# Altium PCB Vibration_Datalogger.PcbDoc (part 5 of 7)
Units mm, origin at the board's own origin, x right, y up, seen from the top; angles counter-clockwise.
Board outline 75.58 x 57.4 mm, 4 copper layers (Top Layer, Int1 (GND), Int2 (PWR), Bottom Layer), stack 1.44 mm thick; 126 components, 59 nets, 413 pads, 160 vias.
Unrouted connection lines stored in the file: 53.
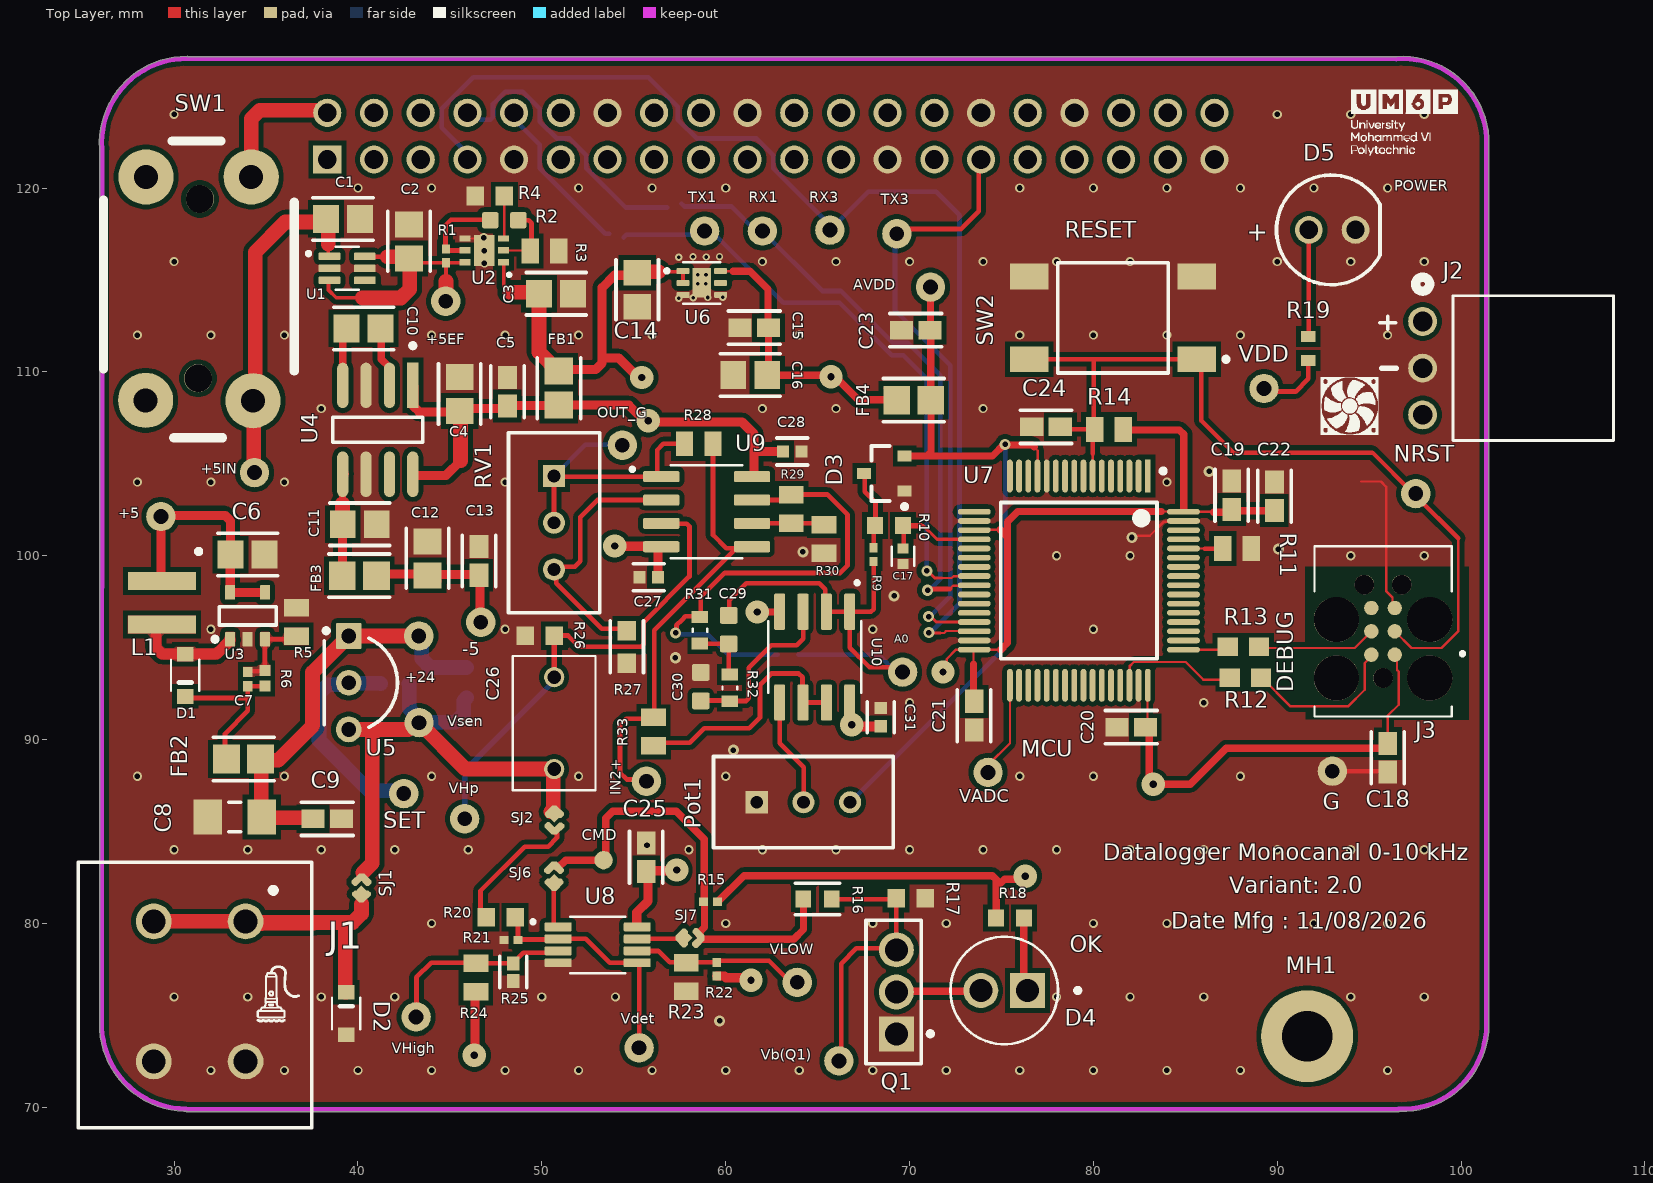
[diagram p0: Top Layer view]

## Part data (continued)
R25: "RES SMD 15K OHM 0.1% 1/16W 0402", Case Code (Imperial)=0402, Max Operating Temperature=155°C, Max Power Dissipation=63mW, Min Operating Temperature=-55°C, Power Rating=62.5mW, Resistance=15kΩ, Supplier Part Number 1=YAG2302DKR-ND, Temperature Coefficient=25ppm/°C, Tolerance=0.1%, Voltage Rating=50V, Case/Package=0402, China RoHS=Non-Compliant, ComponentLink1Description=https://datasheet.octopart.com:443/RT0402BRD0715KL-Yageo-datasheet-176402239.pdf?src-supplier=Future+Electronics, ComponentLink1URL=https://datasheet.octopart.com:443/RT0402BRD0715KL-Yageo-datasheet-176402239.pdf?src-supplier=Future+Electronics, ComponentLink2Description=https://datasheet.octopart.com:443/RT0402BRD0715KL-Yageo-datasheet-169971040.pdf?src-supplier=Future+Electronics, ComponentLink2URL=https://datasheet.octopart.com:443/RT0402BRD0715KL-Yageo-datasheet-169971040.pdf?src-supplier=Future+Electronics, ComponentLink3Description=https://datasheet.octopart.com:443/RT0402BRD0715KL-Yageo-datasheet-166250672.pdf?src-supplier=Future+Electronics, ComponentLink3URL=https://datasheet.octopart.com:443/RT0402BRD0715KL-Yageo-datasheet-166250672.pdf?src-supplier=Future+Electronics, ComponentLink4Description=https://datasheet.octopart.com:443/RT0402BRD0715KL-Yageo-datasheet-136673517.pdf?src-supplier=Future+Electronics, ComponentLink4URL=https://datasheet.octopart.com:443/RT0402BRD0715KL-Yageo-datasheet-136673517.pdf?src-supplier=Future+Electronics, ComponentLink5Description=https://datasheet.octopart.com:443/RT0402BRD0715KL-Yageo-datasheet-137700930.pdf?src-supplier=Future+Electronics, ComponentLink5URL=https://datasheet.octopart.com:443/RT0402BRD0715KL-Yageo-datasheet-137700930.pdf?src-supplier=Future+Electronics, ComponentLink6Description=https://datasheet.octopart.com:443/RT0402BRD0715KL-Yageo-datasheet-41589729.pdf?src-supplier=Future+Electronics, ComponentLink6URL=https://datasheet.octopart.com:443/RT0402BRD0715KL-Yageo-datasheet-41589729.pdf?src-supplier=Future+Electronics, ComponentLink7Description=https://datasheet.octopart.com:443/RT0402BRD0715KL-Yageo-datasheet-12594463.pdf?src-supplier=Future+Electronics, ComponentLink7URL=https://datasheet.octopart.com:443/RT0402BRD0715KL-Yageo-datasheet-12594463.pdf?src-supplier=Future+Electronics, ComponentLink8Description=https://datasheet.octopart.com:443/RT0402BRD0715KL-Yageo-datasheet-10915759.pdf?src-supplier=Future+Electronics, ComponentLink8URL=https://datasheet.octopart.com:443/RT0402BRD0715KL-Yageo-datasheet-10915759.pdf?src-supplier=Future+Electronics, ComponentLink9Description=https://datasheet.octopart.com:443/RT0402BRD0715KL-Yageo-datasheet-34924148.pdf?src-supplier=Future+Electronics, ComponentLink9URL=https://datasheet.octopart.com:443/RT0402BRD0715KL-Yageo-datasheet-34924148.pdf?src-supplier=Future+Electronics, ComponentLink10Description=https://datasheet.octopart.com:443/RT0402BRD0715KL-Yageo-datasheet-96443642.pdf?src-supplier=Upverter, ComponentLink10URL=https://datasheet.octopart.com:443/RT0402BRD0715KL-Yageo-datasheet-96443642.pdf?src-supplier=Upverter, ComponentLink11Description=https://datasheet.octopart.com:443/RT0402BRD0715KL-Yageo-Group-datasheet-188167888.pdf?src-supplier=TME, ComponentLink11URL=https://datasheet.octopart.com:443/RT0402BRD0715KL-Yageo-Group-datasheet-188167888.pdf?src-supplier=TME, ComponentLink12Description=https://datasheet.octopart.com:443/RT0402BRD0715KL-Yageo-datasheet-164439670.pdf?src-supplier=Newark, ComponentLink12URL=https://datasheet.octopart.com:443/RT0402BRD0715KL-Yageo-datasheet-164439670.pdf?src-supplier=Newark, ComponentLink13Description=https://datasheet.octopart.com:443/RT0402BRD0715KL-Yageo-Group-datasheet-141265893.pdf?src-supplier=ODG+(Origin+Data+Global), ComponentLink13URL=https://datasheet.octopart.com:443/RT0402BRD0715KL-Yageo-Group-datasheet-141265893.pdf?src-supplier=ODG+(Origin+Data+Global), ComponentLink14Description=https://datasheet.octopart.com/RT0402BRD0715KL-Yageo-datasheet-86813807.pdf, ComponentLink14URL=https://datasheet.octopart.com/RT0402BRD0715KL-Yageo-datasheet-86813807.pdf, ComponentLink15Description=http://sigma.octopart.com:80/conflict_mineral_statement/Yageo-company-3.pdf?src-supplier=Compliance+Statements, ComponentLink15URL=http://sigma.octopart.com:80/conflict_mineral_statement/Yageo-company-3.pdf?src-supplier=Compliance+Statements, ComponentLink16Description=http://sigma.octopart.com:80/rohs_statement/Yageo-company-2.pdf?src-supplier=Compliance+Statements, ComponentLink16URL=http://sigma.octopart.com:80/rohs_statement/Yageo-company-2.pdf?src-supplier=Compliance+Statements, Composition="Thin Film", Country of Origin="Mainland China", Depth=500µm, Export Control Classification Number (ECCN) Code=EAR99, Features="Moisture Resistant", Harmonized Tariff Schedule (HTS) Code=8533.21.00.30, Height=300µm, Introduction Date=2008-06-09, Lead Free="Lead Free", Length=1mm, Lifecycle Status=Production, Military Standard=Not, Mount="Surface Mount", Number of Terminals=2, Number of Terminations=2, REACH SVHC=Yes, Schedule B="8533210045, 8533210045|8533210045|8533210045|8533210045|8533210045", Supplier 1=DigiKey, Termination=SMD/SMT, Voltage Rating (DC)=50V, Width=500µm, Working Voltage=50V
R27: "RES 1K OHM 1% 1/10W 0603", Case Code (Imperial)=0603, Max Operating Temperature=155°C, Min Operating Temperature=-55°C, Power Dissipation=100mW, Resistance=1kΩ, Supplier Part Number 1=311-1.00KHRDKR-ND, Temperature Coefficient=100ppm/°C, Tolerance=1%, Voltage Rating=50V, Working Voltage=75V, Case Code (Metric)=0603, Case/Package=0603, China RoHS=Non-Compliant, ComponentLink1Description=https://datasheet.octopart.com:443/RC0603FR-071KL-Yageo-datasheet-175887523.pdf?src-supplier=Newark, ComponentLink1URL=https://datasheet.octopart.com:443/RC0603FR-071KL-Yageo-datasheet-175887523.pdf?src-supplier=Newark, ComponentLink2Description=https://datasheet.octopart.com:443/RC0603FR-071KL-Yageo-datasheet-34211833.pdf?src-supplier=Newark, ComponentLink2URL=https://datasheet.octopart.com:443/RC0603FR-071KL-Yageo-datasheet-34211833.pdf?src-supplier=Newark, ComponentLink3Description=https://datasheet.octopart.com:443/RC0603FR-071KL-Yageo-datasheet-12596169.pdf?src-supplier=Newark, ComponentLink3URL=https://datasheet.octopart.com:443/RC0603FR-071KL-Yageo-datasheet-12596169.pdf?src-supplier=Newark, ComponentLink4Description=https://datasheet.octopart.com:443/RC0603FR-071KL-Yageo-datasheet-499455.pdf?src-supplier=Newark, ComponentLink4URL=https://datasheet.octopart.com:443/RC0603FR-071KL-Yageo-datasheet-499455.pdf?src-supplier=Newark, ComponentLink5Description=https://datasheet.octopart.com:443/RC0603FR-071KL-Yageo-datasheet-503470.pdf?src-supplier=Newark, ComponentLink5URL=https://datasheet.octopart.com:443/RC0603FR-071KL-Yageo-datasheet-503470.pdf?src-supplier=Newark, ComponentLink6Description=https://datasheet.octopart.com:443/RC0603FR-071KL-Yageo-datasheet-62067350.pdf?src-supplier=element14+APAC, ComponentLink6URL=https://datasheet.octopart.com:443/RC0603FR-071KL-Yageo-datasheet-62067350.pdf?src-supplier=element14+APAC, ComponentLink7Description=https://datasheet.octopart.com:443/RC0603FR-071KL-Yageo-datasheet-21426514.pdf?src-supplier=element14+APAC, ComponentLink7URL=https://datasheet.octopart.com:443/RC0603FR-071KL-Yageo-datasheet-21426514.pdf?src-supplier=element14+APAC, ComponentLink8Description=https://datasheet.octopart.com:443/RC0603FR-071KL-Yageo-datasheet-141265859.pdf?src-supplier=Upverter, ComponentLink8URL=https://datasheet.octopart.com:443/RC0603FR-071KL-Yageo-datasheet-141265859.pdf?src-supplier=Upverter, ComponentLink9Description=https://datasheet.octopart.com:443/RC0603FR-071KL-Yageo-datasheet-103092701.pdf?src-supplier=Upverter, ComponentLink9URL=https://datasheet.octopart.com:443/RC0603FR-071KL-Yageo-datasheet-103092701.pdf?src-supplier=Upverter, ComponentLink10Description=https://sigma.octopart.com:443/138820526/technical_drawing/Yageo-RC0603FR-071KL.pdf?src-supplier=Upverter, ComponentLink10URL=https://sigma.octopart.com:443/138820526/technical_drawing/Yageo-RC0603FR-071KL.pdf?src-supplier=Upverter, ComponentLink11Description=https://datasheet.octopart.com:443/RC0603FR-071KL-Yageo-datasheet-68297981.pdf?src-supplier=Upverter, ComponentLink11URL=https://datasheet.octopart.com:443/RC0603FR-071KL-Yageo-datasheet-68297981.pdf?src-supplier=Upverter, ComponentLink12Description=https://datasheet.octopart.com:443/RC0603FR-071KL-Yageo-datasheet-8328172.pdf?src-supplier=Farnell, ComponentLink12URL=https://datasheet.octopart.com:443/RC0603FR-071KL-Yageo-datasheet-8328172.pdf?src-supplier=Farnell, ComponentLink13Description=https://datasheet.octopart.com:443/RC0603FR-071KL-Yageo-datasheet-13691069.pdf?src-supplier=Farnell, ComponentLink13URL=https://datasheet.octopart.com:443/RC0603FR-071KL-Yageo-datasheet-13691069.pdf?src-supplier=Farnell, ComponentLink14Description=https://datasheet.octopart.com:443/RC0603FR-071KL-Yageo-datasheet-15599030.pdf?src-supplier=Seeed+Studio, ComponentLink14URL=https://datasheet.octopart.com:443/RC0603FR-071KL-Yageo-datasheet-15599030.pdf?src-supplier=Seeed+Studio, ComponentLink15Description=https://datasheet.octopart.com:443/RC0603FR-071KL-Yageo-Group-datasheet-176638170.pdf?src-supplier=Future+Electronics, ComponentLink15URL=https://datasheet.octopart.com:443/RC0603FR-071KL-Yageo-Group-datasheet-176638170.pdf?src-supplier=Future+Electronics, ComponentLink16Description=https://datasheet.octopart.com:443/RC0603FR-071KL-Yageo-datasheet-164759695.pdf?src-supplier=Future+Electronics, ComponentLink16URL=https://datasheet.octopart.com:443/RC0603FR-071KL-Yageo-datasheet-164759695.pdf?src-supplier=Future+Electronics, ComponentLink17Description=https://datasheet.octopart.com:443/RC0603FR-071KL-Yageo-datasheet-137700087.pdf?src-supplier=Future+Electronics, ComponentLink17URL=https://datasheet.octopart.com:443/RC0603FR-071KL-Yageo-datasheet-137700087.pdf?src-supplier=Future+Electronics, ComponentLink18Description=https://datasheet.octopart.com:443/RC0603FR071KL-Yageo-datasheet-27584510.pdf?src-supplier=Future+Electronics, ComponentLink18URL=https://datasheet.octopart.com:443/RC0603FR071KL-Yageo-datasheet-27584510.pdf?src-supplier=Future+Electronics, ComponentLink19Description=https://datasheet.octopart.com:443/RC0603FR-071KL-Yageo-datasheet-8324193.pdf?src-supplier=Future+Electronics, ComponentLink19URL=https://datasheet.octopart.com:443/RC0603FR-071KL-Yageo-datasheet-8324193.pdf?src-supplier=Future+Electronics, ComponentLink20Description=https://datasheet.octopart.com:443/RC0603FR-071KL-Yageo-datasheet-79472498.pdf?src-supplier=Megastar, ComponentLink20URL=https://datasheet.octopart.com:443/RC0603FR-071KL-Yageo-datasheet-79472498.pdf?src-supplier=Megastar, ComponentLink21Description=https://datasheet.octopart.com/RC0603FR-071KL-Yageo-datasheet-73766026.pdf, ComponentLink21URL=https://datasheet.octopart.com/RC0603FR-071KL-Yageo-datasheet-73766026.pdf, ComponentLink22Description=https://datasheet.octopart.com:443/RC0603FR-071KL-Yageo-datasheet-118562.pdf?src-supplier=DigiKey, ComponentLink22URL=https://datasheet.octopart.com:443/RC0603FR-071KL-Yageo-datasheet-118562.pdf?src-supplier=DigiKey, ComponentLink23Description=http://sigma.octopart.com:80/conflict_mineral_statement/Yageo-company-3.pdf?src-supplier=Compliance+Statements, ComponentLink23URL=http://sigma.octopart.com:80/conflict_mineral_statement/Yageo-company-3.pdf?src-supplier=Compliance+Statements, ComponentLink24Description=http://sigma.octopart.com:80/rohs_statement/Yageo-company-2.pdf?src-supplier=Compliance+Statements, ComponentLink24URL=http://sigma.octopart.com:80/rohs_statement/Yageo-company-2.pdf?src-supplier=Compliance+Statements, Composition="Thick Film", Contact Plating=Tin, Country of Origin="Mainland China, Taiwan", Depth=800µm, Export Control Classification Number (ECCN) Code=EAR99, Harmonized Tariff Schedule (HTS) Code=8533.21.00.30, Height=450µm, Introduction Date=2004-10-04, Lead Free="Lead Free", Length=1.6mm, Lifecycle Status=Production, Military Standard=Not, Mount="Surface Mount", Number of Pins=2, Number of Terminals=2, Packaging="Tape and Reel", Power Rating=100mW, Radiation Hardening=No, REACH SVHC=Yes, Schedule B="8533210045, 8533210045|8533210045|8533210045|8533210045|8533210045|8533210045|8533210045|8533210045|8533210045|8533210045|8533210045|8533210045|8533210045|8533210045|8533210045|8533210045|8533210045|8533210045|8533210045|8533210045|8533210045|8533210045|8533210045|85", Supplier 1=DigiKey, Termination=SMD/SMT, Voltage Rating (DC)=50V, Width=800µm
R31 R32: "RES SMD 1.33KOHM 0.1% 1/10W 0603", Case Code (Imperial)=0603, Case Code (Metric)=1608, Manufacturer=Panasonic, Manufacturer Lifecycle Status=ACTIVE, Manufacturer Part Number=ERA3AEB1331V, Max Operating Temperature=155°C, Max Power Dissipation=100mW, Min Operating Temperature=-55°C, Ratings=AEC-Q200, Resistance=1.33kΩ, Supplier Part Number 1=P1.33KDBDKR-ND, Temperature Coefficient=25ppm/°C, Tolerance=0.1%, Voltage Rating=150V, Voltage Rating (DC)=75V, Case/Package=0603, Category="Chip SMD Resistors", ComponentLink1Description=https://datasheet.octopart.com:443/ERA3AEB1331V-Panasonic-datasheet-181959660.pdf?src-supplier=IHS, ComponentLink1URL=https://datasheet.octopart.com:443/ERA3AEB1331V-Panasonic-datasheet-181959660.pdf?src-supplier=IHS, ComponentLink2Description=https://datasheet.octopart.com:443/ERA3AEB1331V-Panasonic-datasheet-62287448.pdf?src-supplier=Newark, ComponentLink2URL=https://datasheet.octopart.com:443/ERA3AEB1331V-Panasonic-datasheet-62287448.pdf?src-supplier=Newark, ComponentLink3Description=https://datasheet.octopart.com:443/ERA3AEB1331V-Panasonic-datasheet-136531316.pdf?src-supplier=Newark, ComponentLink3URL=https://datasheet.octopart.com:443/ERA3AEB1331V-Panasonic-datasheet-136531316.pdf?src-supplier=Newark, ComponentLink4Description=https://datasheet.octopart.com:443/ERA-3AEB1331V-Panasonic-datasheet-154766165.pdf?src-supplier=Master+Electronics, ComponentLink4URL=https://datasheet.octopart.com:443/ERA-3AEB1331V-Panasonic-datasheet-154766165.pdf?src-supplier=Master+Electronics, ComponentLink5Description=https://datasheet.octopart.com:443/ERA3AEB1331V-Panasonic-datasheet-8367715.pdf?src-supplier=Farnell, ComponentLink5URL=https://datasheet.octopart.com:443/ERA3AEB1331V-Panasonic-datasheet-8367715.pdf?src-supplier=Farnell, ComponentLink6Description=https://datasheet.octopart.com:443/ERA3AEB1331V-Panasonic---ECG-datasheet-15994758.pdf?src-supplier=Farnell, ComponentLink6URL=https://datasheet.octopart.com:443/ERA3AEB1331V-Panasonic---ECG-datasheet-15994758.pdf?src-supplier=Farnell, ComponentLink7Description=https://datasheet.octopart.com:443/ERA3AEB1331V-Panasonic-datasheet-188913046.pdf?src-supplier=TME, ComponentLink7URL=https://datasheet.octopart.com:443/ERA3AEB1331V-Panasonic-datasheet-188913046.pdf?src-supplier=TME, ComponentLink8Description=https://sigma.octopart.com:443/150570796/technical_drawing/Panasonic-ERA3AEB1331V.pdf?src-supplier=Panasonic+SCT, ComponentLink8URL=https://sigma.octopart.com:443/150570796/technical_drawing/Panasonic-ERA3AEB1331V.pdf?src-supplier=Panasonic+SCT, ComponentLink9Description=https://datasheet.octopart.com:443/ERA3AEB1331V-Panasonic-datasheet-138783076.pdf?src-supplier=Burklin+Elektronik, ComponentLink9URL=https://datasheet.octopart.com:443/ERA3AEB1331V-Panasonic-datasheet-138783076.pdf?src-supplier=Burklin+Elektronik, ComponentLink10Description=https://datasheet.octopart.com/ERA3AEB1331V-Panasonic-datasheet-78375410.pdf, ComponentLink10URL=https://datasheet.octopart.com/ERA3AEB1331V-Panasonic-datasheet-78375410.pdf, ComponentLink11Description=https://datasheet.octopart.com:443/ERA-3AEB1331V-Panasonic-datasheet-62096640.pdf?src-supplier=Future+Electronics, ComponentLink11URL=https://datasheet.octopart.com:443/ERA-3AEB1331V-Panasonic-datasheet-62096640.pdf?src-supplier=Future+Electronics, ComponentLink12Description=https://datasheet.octopart.com:443/ERA3AEB1331V-Panasonic-datasheet-13266200.pdf?src-supplier=Electro+Sonic, ComponentLink12URL=https://datasheet.octopart.com:443/ERA3AEB1331V-Panasonic-datasheet-13266200.pdf?src-supplier=Electro+Sonic, ComponentLink13Description=https://datasheet.octopart.com:443/ERA3AEB1331V-Panasonic-datasheet-33006989.pdf?src-supplier=Electro+Sonic, ComponentLink13URL=https://datasheet.octopart.com:443/ERA3AEB1331V-Panasonic-datasheet-33006989.pdf?src-supplier=Electro+Sonic, ComponentLink14Description=https://datasheet.octopart.com:443/ERA-3AEB1331V-Panasonic-datasheet-46744048.pdf?src-supplier=Electro+Sonic, ComponentLink14URL=https://datasheet.octopart.com:443/ERA-3AEB1331V-Panasonic-datasheet-46744048.pdf?src-supplier=Electro+Sonic, Composition="Thin Film", Contact Plating=Tin, Depth=800µm, Features="Automotive AEC-Q200", Height=450µm, Height - Seated (Max)=558.8µm, Lead Free="Lead Free", Length=1.6mm, Lifecycle Status=Production, Military Standard=Not, Mount="Surface Mount", Number of Pins=2, Number of Terminals=2, Number of Terminations=2, Packaging="Tape & Reel", Part Series="Thin Film Chip Resistors, High Reliability Type", Power Rating=100mW, Radiation Hardening=No, REACH SVHC=Yes, Schedule B="8533210045, 8533210045|8533210045, 8533210045|8533210045|8533210045, 8533210045|8533210045|8533210045|8533210045", Supplier 1=DigiKey, Termination=SMD/SMT, Width=800µm, Working Voltage=75V
SW1: "Boutons-poussoirs 1 Pole Vertical 1A 14.5V 1.5mm Travel", Contact Resistance=100mΩ, Current Rating=1A, Insulation Resistance=3MΩ, Manufacturer=ALPS, Max Operating Temperature=85°C, Max Voltage Rating (DC)=14.5V, Min Operating Temperature=-40°C, Operating Force=3N, Supplier Part Number 1=688-SPEF110100, Voltage Rating (AC)=100V, Actuator Length=5.0038mm, Category="Pushbutton Switches", ComponentLink1Description=https://datasheet.octopart.com:443/SPEF110100-ALPS-datasheet-182234832.pdf?src-supplier=IHS, ComponentLink1URL=https://datasheet.octopart.com:443/SPEF110100-ALPS-datasheet-182234832.pdf?src-supplier=IHS, ComponentLink2Description=https://datasheet.octopart.com:443/SPEF110100-ALPS-datasheet-182235328.pdf?src-supplier=IHS, ComponentLink2URL=https://datasheet.octopart.com:443/SPEF110100-ALPS-datasheet-182235328.pdf?src-supplier=IHS, Electrical Life=30kcycles, Export Control Classification Number (ECCN) Code=EAR99, Harmonized Tariff Schedule (HTS) Code=8536.50.70.00, Height=6.9mm, Introduction Date=2015-04-16, Length=9.398mm, Lifecycle Status=Production, Manufacturer Part Number=SPEF110100, Max Current Rating=1A, Mount=Bushing, Radiation Hardening=No, Supplier 1=Mouser, Termination=Solder, Throw Configuration=SPDT, Voltage Rating (DC)=14.5V
SW2: "SWITCH TACTILE SPST-NO 0.05A 12V", Color=Beige, Contact Resistance=100mΩ, Current Rating=50mA, Insulation Resistance=100MΩ, Max Operating Temperature=70°C, Max Voltage Rating (DC)=12V, Min Operating Temperature=-40°C, Operating Force=2.55N, Supplier Part Number 1=EG2527CT-ND, Actuator Length=1.4mm, Actuator Material="Nylon, Polyamide", China RoHS=Compliant, ComponentLink1Description=https://datasheet.octopart.com:443/TL3301AF260QG-E-Switch-datasheet-165859977.pdf?src-supplier=Future+Electronics, ComponentLink1URL=https://datasheet.octopart.com:443/TL3301AF260QG-E-Switch-datasheet-165859977.pdf?src-supplier=Future+Electronics, ComponentLink2Description=https://datasheet.octopart.com:443/TL3301AF260QG-E-Switch-datasheet-32479546.pdf?src-supplier=Future+Electronics, ComponentLink2URL=https://datasheet.octopart.com:443/TL3301AF260QG-E-Switch-datasheet-32479546.pdf?src-supplier=Future+Electronics, ComponentLink3Description=https://datasheet.octopart.com:443/TL3301AF260QG-E-Switch-datasheet-26831008.pdf?src-supplier=Future+Electronics, ComponentLink3URL=https://datasheet.octopart.com:443/TL3301AF260QG-E-Switch-datasheet-26831008.pdf?src-supplier=Future+Electronics, ComponentLink4Description=https://datasheet.octopart.com:443/TL3301AF260QG-E-Switch-datasheet-8331992.pdf?src-supplier=Future+Electronics, ComponentLink4URL=https://datasheet.octopart.com:443/TL3301AF260QG-E-Switch-datasheet-8331992.pdf?src-supplier=Future+Electronics, ComponentLink5Description=https://datasheet.octopart.com:443/TL3301AF260QG-E-Switch-datasheet-500121.pdf?src-supplier=Farnell, ComponentLink5URL=https://datasheet.octopart.com:443/TL3301AF260QG-E-Switch-datasheet-500121.pdf?src-supplier=Farnell, ComponentLink6Description=https://datasheet.octopart.com:443/TL3301AF260QG-E-Switch-datasheet-100437263.pdf?src-supplier=Farnell, ComponentLink6URL=https://datasheet.octopart.com:443/TL3301AF260QG-E-Switch-datasheet-100437263.pdf?src-supplier=Farnell, ComponentLink7Description=https://datasheet.octopart.com:443/TL3301AF260QG-E-Switch-datasheet-140258799.pdf?src-supplier=LKR, ComponentLink7URL=https://datasheet.octopart.com:443/TL3301AF260QG-E-Switch-datasheet-140258799.pdf?src-supplier=LKR, ComponentLink8Description=https://datasheet.octopart.com:443/TL3301AF260QG-E-Switch-datasheet-27847350.pdf?src-supplier=Master+Electronics, ComponentLink8URL=https://datasheet.octopart.com:443/TL3301AF260QG-E-Switch-datasheet-27847350.pdf?src-supplier=Master+Electronics, ComponentLink9Description=https://datasheet.octopart.com:443/TL3301AF260QG-E-Switch-datasheet-155463340.pdf?src-supplier=TME, ComponentLink9URL=https://datasheet.octopart.com:443/TL3301AF260QG-E-Switch-datasheet-155463340.pdf?src-supplier=TME, Contact Material=Silver, Contact Plating=Silver, Electrical Life=100kcycles, Export Control Classification Number (ECCN) Code=EAR99, Harmonized Tariff Schedule (HTS) Code=8536.50.90.40, Height=3.6mm, Housing Material=Nylon, Illumination Type="Illuminated, Non-Illuminated", Introduction Date=2002-10-30, Lead Free="Lead Free", Length=6mm, Lifecycle Status=Production, Max Current Rating=50mA, Mechanical Life=100kcycles, Mount="Surface Mount", Number of Positions=1, Orientation=Straight, REACH SVHC=Yes, Supplier 1=DigiKey, Switch Function=Off-Mom, Switch Travel=250µm, Termination="Gull Wing", Throw Configuration=SPST, Voltage Rating (DC)=12V
U1: "IC OR CTRLR IDEAL DIODE SC70-6", Manufacturer="Analog Devices", Manufacturer Lifecycle Status=PRODUCTION, Manufacturer Part Number=MAX40200EVKIT#, Supplier Part Number 1=MAX40200EVKIT#-ND, Category="Amplifiers - Op Amps, Buffer, Instrumentation", ComponentLink1Description=https://octopart.com:443/opatz8j6/c1?t=tFvwJybQxdRSwHGuV29_04fkZjjNF1MJo4kinNSI_C2zYoGudT1WcQQrGEb18paZwrfXNr0GAhVW6zbilzcBUB01kDOundBfp3nAPKdGzhNRfNcr8Kd-o-IKbnLChbPI5acuj80HihnZ3YpglhuC93YoD2liOY8pIrKlWfxI2ksNeIXQmkzMRd3OxJBCHjiq5JwTIkqXKKJBcnIlnmQq-BxXXM0xZlJtTE9yy0iN-9Jw-BxLeaepZGVZeQukyGP-V4ddPgPOIL7y7GG0xbs0JlcCHvXn2V6R1aO10raT6v7tAmg4PF3dHGB7KA&src-supplier=Analog+Devices, ComponentLink1URL=https://octopart.com:443/opatz8j6/c1?t=tFvwJybQxdRSwHGuV29_04fkZjjNF1MJo4kinNSI_C2zYoGudT1WcQQrGEb18paZwrfXNr0GAhVW6zbilzcBUB01kDOundBfp3nAPKdGzhNRfNcr8Kd-o-IKbnLChbPI5acuj80HihnZ3YpglhuC93YoD2liOY8pIrKlWfxI2ksNeIXQmkzMRd3OxJBCHjiq5JwTIkqXKKJBcnIlnmQq-BxXXM0xZlJtTE9yy0iN-9Jw-BxLeaepZGVZeQukyGP-V4ddPgPOIL7y7GG0xbs0JlcCHvXn2V6R1aO10raT6v7tAmg4PF3dHGB7KA&src-supplier=Analog+Devices, ComponentLink2Description=https://datasheet.octopart.com:443/MAX40200EVKIT%23-Analog-Devices-datasheet-68620197.pdf?src-supplier=Newark, ComponentLink2URL=https://datasheet.octopart.com:443/MAX40200EVKIT%23-Analog-Devices-datasheet-68620197.pdf?src-supplier=Newark, ComponentLink3Description=https://datasheet.octopart.com:443/MAX40200EVKIT%23-Maxim-Integrated-datasheet-97040573.pdf?src-supplier=Ciiva, ComponentLink3URL=https://datasheet.octopart.com:443/MAX40200EVKIT%23-Maxim-Integrated-datasheet-97040573.pdf?src-supplier=Ciiva, ComponentLink4Description=http://sigma.octopart.com:80/conflict_mineral_statement/Analog-Devices-company-33.pdf?src-supplier=Compliance+Statements, ComponentLink4URL=http://sigma.octopart.com:80/conflict_mineral_statement/Analog-Devices-company-33.pdf?src-supplier=Compliance+Statements, ComponentLink5Description=http://sigma.octopart.com:80/reach_statement/Maxim-Integrated-company-67.pdf?src-supplier=Compliance+Statements, ComponentLink5URL=http://sigma.octopart.com:80/reach_statement/Maxim-Integrated-company-67.pdf?src-supplier=Compliance+Statements, ComponentLink6Description=http://sigma.octopart.com:80/rohs_statement/Maxim-Integrated-company-66.pdf?src-supplier=Compliance+Statements, ComponentLink6URL=http://sigma.octopart.com:80/rohs_statement/Maxim-Integrated-company-66.pdf?src-supplier=Compliance+Statements, ComponentLink7Description=http://sigma.octopart.com:80/conflict_mineral_statement/Maxim-Integrated-company-65.pdf?src-supplier=Compliance+Statements, ComponentLink7URL=http://sigma.octopart.com:80/conflict_mineral_statement/Maxim-Integrated-company-65.pdf?src-supplier=Compliance+Statements, ComponentLink8Description=https://octopart.com:443/opatz8j6/c1?t=lhYu1Dpa7LTUDRbSap38YS8RgdPNFucjyNBj1iBkH97VRV8Rz1sSJR_WbuGUEwASAToy64Q0WSWPLIrJ0T-nAuuegVbGWQDHKGX6zqZYr7BGDpqmoHu2Bx2I_9gTjHXC6Q3FVvsiWqfKxC4DKphXuDHYAktRAVkNYmR-AyWh8y_m0Ao45k5rUSJWIEdRU4kKjG7oew-8Zey8BXwpe1A7gxB-7jWBlaKfgfRJWbIXmBBGq6MNPZxkt7axoHwTDuLmHCNj-BNWr3LFNcmmigWLHCOy2qpNNTU7f_1GGqCMT2krBxkwy2j1AE6zAA&src-supplier=Compliance+Statements, ComponentLink8URL=https://octopart.com:443/opatz8j6/c1?t=lhYu1Dpa7LTUDRbSap38YS8RgdPNFucjyNBj1iBkH97VRV8Rz1sSJR_WbuGUEwASAToy64Q0WSWPLIrJ0T-nAuuegVbGWQDHKGX6zqZYr7BGDpqmoHu2Bx2I_9gTjHXC6Q3FVvsiWqfKxC4DKphXuDHYAktRAVkNYmR-AyWh8y_m0Ao45k5rUSJWIEdRU4kKjG7oew-8Zey8BXwpe1A7gxB-7jWBlaKfgfRJWbIXmBBGq6MNPZxkt7axoHwTDuLmHCNj-BNWr3LFNcmmigWLHCOy2qpNNTU7f_1GGqCMT2krBxkwy2j1AE6zAA&src-supplier=Compliance+Statements, ComponentLink9Description=https://sigma.octopart.com:443/182282881/technical_drawing/Texas-Instruments-LM66100DCKR.pdf?src-supplier=Texas+Instruments, ComponentLink9URL=https://sigma.octopart.com:443/182282881/technical_drawing/Texas-Instruments-LM66100DCKR.pdf?src-supplier=Texas+Instruments, ComponentLink10Description=https://octopart.com:443/opatz8j6/c1?t=gPN0KfNaSyl1Jmpah-FtwEVBma6UUM1rl0h9fkGMVmOMkDkGAR5eANZSmXeULewPONOsdPcJF3l7HmsVxdSPKkJhfxN-W-y3_Dz8nEmVy4_KCMSg8IKJ1aK1b6dd_-lBB8AspW_E3SjYcpWMYk21piWnDxo2wj_olAEqlfdPT3wM4A0W15MhlRfy1F4koMZBOZ1iTSy3Fn5Q08Ie82jiMGpjle9KvlKTYKALn1cbScAkVWpjv40trNU2vz6I3zWF1hu3m4xMYxVIRa3xiN9pV6fBa2Lpcw1bs8mCpy-ETl7Wi3TV7TgH1BZJhC7NO3ryfYbwwTmsEcijnrG4LoteN3ANdJgPfKX2jeXCkaz5iFtb7oDgnzFTK08_BwgTfkX6eAf0F7jE&src-supplier=Texas+Instruments, ComponentLink10URL=https://octopart.com:443/opatz8j6/c1?t=gPN0KfNaSyl1Jmpah-FtwEVBma6UUM1rl0h9fkGMVmOMkDkGAR5eANZSmXeULewPONOsdPcJF3l7HmsVxdSPKkJhfxN-W-y3_Dz8nEmVy4_KCMSg8IKJ1aK1b6dd_-lBB8AspW_E3SjYcpWMYk21piWnDxo2wj_olAEqlfdPT3wM4A0W15MhlRfy1F4koMZBOZ1iTSy3Fn5Q08Ie82jiMGpjle9KvlKTYKALn1cbScAkVWpjv40trNU2vz6I3zWF1hu3m4xMYxVIRa3xiN9pV6fBa2Lpcw1bs8mCpy-ETl7Wi3TV7TgH1BZJhC7NO3ryfYbwwTmsEcijnrG4LoteN3ANdJgPfKX2jeXCkaz5iFtb7oDgnzFTK08_BwgTfkX6eAf0F7jE&src-supplier=Texas+Instruments, ComponentLink11Description=https://sigma.octopart.com:443/178868976/technical_drawing/Texas-Instruments-LM66100DCKR.pdf?src-supplier=Texas+Instruments, ComponentLink11URL=https://sigma.octopart.com:443/178868976/technical_drawing/Texas-Instruments-LM66100DCKR.pdf?src-supplier=Texas+Instruments, ComponentLink12Description=https://sigma.octopart.com:443/49249328/technical_drawing/Texas-Instruments-LM66100DCKR.pdf?src-supplier=Texas+Instruments, ComponentLink12URL=https://sigma.octopart.com:443/49249328/technical_drawing/Texas-Instruments-LM66100DCKR.pdf?src-supplier=Texas+Instruments, ComponentLink13Description=https://datasheet.octopart.com:443/LM66100DCKR-Texas-Instruments-datasheet-159115275.pdf?src-supplier=SHENGYU+ELECTRONICS, ComponentLink13URL=https://datasheet.octopart.com:443/LM66100DCKR-Texas-Instruments-datasheet-159115275.pdf?src-supplier=SHENGYU+ELECTRONICS, ComponentLink14Description=https://datasheet.octopart.com:443/LM66100DCKR-Texas-Instruments-datasheet-159115156.pdf?src-supplier=LCSC, ComponentLink14URL=https://datasheet.octopart.com:443/LM66100DCKR-Texas-Instruments-datasheet-159115156.pdf?src-supplier=LCSC, ComponentLink15Description=http://sigma.octopart.com:80/reach_statement/Texas-Instruments-company-64.pdf?src-supplier=Compliance+Statements, ComponentLink15URL=http://sigma.octopart.com:80/reach_statement/Texas-Instruments-company-64.pdf?src-supplier=Compliance+Statements, ComponentLink16Description=http://sigma.octopart.com:80/conflict_mineral_statement/Texas-Instruments-company-63.pdf?src-supplier=Compliance+Statements, ComponentLink16URL=http://sigma.octopart.com:80/conflict_mineral_statement/Texas-Instruments-company-63.pdf?src-supplier=Compliance+Statements, Height=1.1mm, Length=2mm, Lifecycle Status=Production, Number of Pins=0, Schedule B="8542390000, 8542390000|8542390000|8542390000|8542390000|8542390000", Supplier 1=DigiKey, Supplier 2=DigiKey, Supplier Part Number 2=296-53541-1-ND, Thickness=900µm, Width=1.25mm
U2: "2.7-V TO 19-V 100-M EFUSE WITH O", Manufacturer="Texas Instruments", Manufacturer Lifecycle Status=ACTIVE, Supplier Part Number 1=296-TPS25961DRVRCT-ND, Category="Hot Swap Controllers", ComponentLink1Description=https://octopart.com:443/opatz8j6/c1?t=S1xkJqIgFHoRAs614Sh_f7mDPqY7n-9g1CVa4cNi5hxx6g81t8padSBjg378zsPx6m8IwrYaHi_RuHHS21coeVQCG3OxsLdcu6lzfAPU48-dyrvk4_ASk2QRBurpyuabN2jgAu76qrWKpaNbvEDSpOfD9CHua-RjlsRQwE5NGihYh6lU7KWDTs2xfTKoO0KOZB2pCRcjwk9NKxuG5vtAjT0Cx9vbluxsxBt5EiWrL8zHsz4VK5ehUOpKD3pUvdaCDW2TUYzUcGjzIwsfOe_OcwxBHByljdTQNEQqxSW97k3uNZ3rjtL21G73W6U59wTNDYHWdyWMBiSPwAoe43ZHRhsDoItLFKopzT7Ap-yvRHOtwgVqoKwa7xdY_lMZ9kctMjWSG-4I&src-supplier=Texas+Instruments, ComponentLink1URL=https://octopart.com:443/opatz8j6/c1?t=S1xkJqIgFHoRAs614Sh_f7mDPqY7n-9g1CVa4cNi5hxx6g81t8padSBjg378zsPx6m8IwrYaHi_RuHHS21coeVQCG3OxsLdcu6lzfAPU48-dyrvk4_ASk2QRBurpyuabN2jgAu76qrWKpaNbvEDSpOfD9CHua-RjlsRQwE5NGihYh6lU7KWDTs2xfTKoO0KOZB2pCRcjwk9NKxuG5vtAjT0Cx9vbluxsxBt5EiWrL8zHsz4VK5ehUOpKD3pUvdaCDW2TUYzUcGjzIwsfOe_OcwxBHByljdTQNEQqxSW97k3uNZ3rjtL21G73W6U59wTNDYHWdyWMBiSPwAoe43ZHRhsDoItLFKopzT7Ap-yvRHOtwgVqoKwa7xdY_lMZ9kctMjWSG-4I&src-supplier=Texas+Instruments, ComponentLink2Description=http://sigma.octopart.com:80/reach_statement/Texas-Instruments-company-64.pdf?src-supplier=Compliance+Statements, ComponentLink2URL=http://sigma.octopart.com:80/reach_statement/Texas-Instruments-company-64.pdf?src-supplier=Compliance+Statements, ComponentLink3Description=http://sigma.octopart.com:80/conflict_mineral_statement/Texas-Instruments-company-63.pdf?src-supplier=Compliance+Statements, ComponentLink3URL=http://sigma.octopart.com:80/conflict_mineral_statement/Texas-Instruments-company-63.pdf?src-supplier=Compliance+Statements, Height=800µm, Length=2mm, Lifecycle Status=Production, Manufacturer Part Number=TPS25961DRVR, Number of Pins=6, Supplier 1=DigiKey, Thickness=750µm, Width=2mm
U3: "IC LED DRVR RGLTR PWM SOT23-5", Case/Package=SOT-23, Frequency=1MHz, High Level Output Current=50mA, Manufacturer Lifecycle Status=ACTIVE, Max Input Voltage=6V, Max Operating Temperature=85°C, Max Output Voltage=28V, Max Supply Current=50µA, Min Input Voltage=1.8V, Min Operating Temperature=-40°C, Output Current=250mA, Output Power=357mW, Quiescent Current=28µA, Supplier Part Number 1=296-12686-6-ND, ComponentLink1Description=https://sigma.octopart.com:443/177332311/technical_drawing/Texas-Instruments-TPS61041DBVR.pdf?src-supplier=Texas+Instruments, ComponentLink1URL=https://sigma.octopart.com:443/177332311/technical_drawing/Texas-Instruments-TPS61041DBVR.pdf?src-supplier=Texas+Instruments, ComponentLink2Description=https://octopart.com:443/opatz8j6/c1?t=k3wc_2YAHre9aEKvrtUL4WiH_7gyz5vvYIpgl3-_DoieH9_J--UOA_4swiipad8nwfdCqRPE7cAU4y7fXoWH5s6gY_OEZpDmt4BRm_vJuqCU6_G0QTbABtNIj9X3Wk4rNKXV0JPXgFqA4mKESAibKFXCpnwvyJyx-23z5q8y4uzBqg0JgwBOXenSBHlC9K7HJNs8eSKIWkGQ0JIBH81RxiwzCGA96NNC9jBkZo0lS8D4_ep_iqgTZ6YmA3U9-nDW1JxenI6HkSB-BibaSeiW2gkfclnyBbKiNZExXKpJZUM-3bb4z0zpDkNUz1E0CZwEhr9E5_3q7KKvBqOAVMCAxqghPF0D-78aDMoSTVOHvFhBGbArx7jxUefcD653syxCxtR4QA&src-supplier=Texas+Instruments, ComponentLink2URL=https://octopart.com:443/opatz8j6/c1?t=k3wc_2YAHre9aEKvrtUL4WiH_7gyz5vvYIpgl3-_DoieH9_J--UOA_4swiipad8nwfdCqRPE7cAU4y7fXoWH5s6gY_OEZpDmt4BRm_vJuqCU6_G0QTbABtNIj9X3Wk4rNKXV0JPXgFqA4mKESAibKFXCpnwvyJyx-23z5q8y4uzBqg0JgwBOXenSBHlC9K7HJNs8eSKIWkGQ0JIBH81RxiwzCGA96NNC9jBkZo0lS8D4_ep_iqgTZ6YmA3U9-nDW1JxenI6HkSB-BibaSeiW2gkfclnyBbKiNZExXKpJZUM-3bb4z0zpDkNUz1E0CZwEhr9E5_3q7KKvBqOAVMCAxqghPF0D-78aDMoSTVOHvFhBGbArx7jxUefcD653syxCxtR4QA&src-supplier=Texas+Instruments, ComponentLink3Description=https://datasheet.octopart.com:443/TPS61041DBVR-Texas-Instruments-datasheet-37140377.pdf?src-supplier=Texas+Instruments, ComponentLink3URL=https://datasheet.octopart.com:443/TPS61041DBVR-Texas-Instruments-datasheet-37140377.pdf?src-supplier=Texas+Instruments, ComponentLink4Description=https://sigma.octopart.com:443/175570406/technical_drawing/Texas-Instruments-TPS61041DBVR.pdf?src-supplier=Texas+Instruments, ComponentLink4URL=https://sigma.octopart.com:443/175570406/technical_drawing/Texas-Instruments-TPS61041DBVR.pdf?src-supplier=Texas+Instruments, ComponentLink5Description=https://sigma.octopart.com:443/169406034/technical_drawing/Texas-Instruments-TPS61041DBVR.pdf?src-supplier=Texas+Instruments, ComponentLink5URL=https://sigma.octopart.com:443/169406034/technical_drawing/Texas-Instruments-TPS61041DBVR.pdf?src-supplier=Texas+Instruments, ComponentLink6Description=https://sigma.octopart.com:443/155939316/technical_drawing/Texas-Instruments-TPS61041DBVR.pdf?src-supplier=Texas+Instruments, ComponentLink6URL=https://sigma.octopart.com:443/155939316/technical_drawing/Texas-Instruments-TPS61041DBVR.pdf?src-supplier=Texas+Instruments, ComponentLink7Description=https://sigma.octopart.com:443/102331370/technical_drawing/Texas-Instruments-TPS61041DBVR.pdf?src-supplier=Texas+Instruments, ComponentLink7URL=https://sigma.octopart.com:443/102331370/technical_drawing/Texas-Instruments-TPS61041DBVR.pdf?src-supplier=Texas+Instruments, ComponentLink8Description=https://datasheet.octopart.com:443/TPS61041DBVR-Texas-Instruments-datasheet-34157400.pdf?src-supplier=Texas+Instruments, ComponentLink8URL=https://datasheet.octopart.com:443/TPS61041DBVR-Texas-Instruments-datasheet-34157400.pdf?src-supplier=Texas+Instruments, ComponentLink9Description=https://sigma.octopart.com:443/49249325/technical_drawing/Texas-Instruments-TPS61041DBVR.pdf?src-supplier=Texas+Instruments, ComponentLink9URL=https://sigma.octopart.com:443/49249325/technical_drawing/Texas-Instruments-TPS61041DBVR.pdf?src-supplier=Texas+Instruments, ComponentLink10Description=https://datasheet.octopart.com:443/TPS61041DBVR-Texas-Instruments-datasheet-10256988.pdf?src-supplier=Texas+Instruments, ComponentLink10URL=https://datasheet.octopart.com:443/TPS61041DBVR-Texas-Instruments-datasheet-10256988.pdf?src-supplier=Texas+Instruments, ComponentLink11Description=https://datasheet.octopart.com:443/TPS61041DBVR-Texas-Instruments-datasheet-150964.pdf?src-supplier=Farnell, ComponentLink11URL=https://datasheet.octopart.com:443/TPS61041DBVR-Texas-Instruments-datasheet-150964.pdf?src-supplier=Farnell, ComponentLink12Description=https://datasheet.octopart.com:443/TPS61041DBVR-Texas-Instruments-datasheet-13549163.pdf?src-supplier=Upverter, ComponentLink12URL=https://datasheet.octopart.com:443/TPS61041DBVR-Texas-Instruments-datasheet-13549163.pdf?src-supplier=Upverter, ComponentLink13Description=https://datasheet.octopart.com:443/TPS61041DBVR-Texas-Instruments-datasheet-66617810.pdf?src-supplier=Newark, ComponentLink13URL=https://datasheet.octopart.com:443/TPS61041DBVR-Texas-Instruments-datasheet-66617810.pdf?src-supplier=Newark, ComponentLink14Description=https://datasheet.octopart.com:443/TPS61041DBVR-Texas-Instruments-datasheet-5394864.pdf?src-supplier=Newark, ComponentLink14URL=https://datasheet.octopart.com:443/TPS61041DBVR-Texas-Instruments-datasheet-5394864.pdf?src-supplier=Newark, ComponentLink15Description=https://datasheet.octopart.com:443/TPS61041DBVR-Texas-Instruments-datasheet-33019193.pdf?src-supplier=Newark, ComponentLink15URL=https://datasheet.octopart.com:443/TPS61041DBVR-Texas-Instruments-datasheet-33019193.pdf?src-supplier=Newark, ComponentLink16Description=https://datasheet.octopart.com:443/TPS61041DBVR-Texas-Instruments-datasheet-28738.pdf?src-supplier=Newark, ComponentLink16URL=https://datasheet.octopart.com:443/TPS61041DBVR-Texas-Instruments-datasheet-28738.pdf?src-supplier=Newark, ComponentLink17Description=https://datasheet.octopart.com:443/TPS61041DBVR-Texas-Instruments-datasheet-165804802.pdf?src-supplier=LCSC, ComponentLink17URL=https://datasheet.octopart.com:443/TPS61041DBVR-Texas-Instruments-datasheet-165804802.pdf?src-supplier=LCSC, ComponentLink18Description=https://datasheet.octopart.com:443/TPS61041DBVR-Texas-Instruments-datasheet-159118170.pdf?src-supplier=LCSC, ComponentLink18URL=https://datasheet.octopart.com:443/TPS61041DBVR-Texas-Instruments-datasheet-159118170.pdf?src-supplier=LCSC, ComponentLink19Description=https://datasheet.octopart.com:443/TPS61041DBVR-Texas-Instruments-datasheet-137316104.pdf?src-supplier=Future+Electronics, ComponentLink19URL=https://datasheet.octopart.com:443/TPS61041DBVR-Texas-Instruments-datasheet-137316104.pdf?src-supplier=Future+Electronics, ComponentLink20Description=https://datasheet.octopart.com:443/TPS61041DBVR-Texas-Instruments-datasheet-17023098.pdf?src-supplier=Factory+Futures, ComponentLink20URL=https://datasheet.octopart.com:443/TPS61041DBVR-Texas-Instruments-datasheet-17023098.pdf?src-supplier=Factory+Futures, ComponentLink21Description=https://datasheet.octopart.com:443/TPS61041DBVR-Texas-Instruments-datasheet-14155781.pdf?src-supplier=iiiC, ComponentLink21URL=https://datasheet.octopart.com:443/TPS61041DBVR-Texas-Instruments-datasheet-14155781.pdf?src-supplier=iiiC, ComponentLink22Description=https://datasheet.octopart.com:443/TPS61041DBVR-Texas-Instruments-datasheet-8716823.pdf?src-supplier=element14, ComponentLink22URL=https://datasheet.octopart.com:443/TPS61041DBVR-Texas-Instruments-datasheet-8716823.pdf?src-supplier=element14, ComponentLink23Description=https://datasheet.octopart.com:443/TPS61041DBVR-Texas-Instruments-datasheet-8444271.pdf?src-supplier=Jameco, ComponentLink23URL=https://datasheet.octopart.com:443/TPS61041DBVR-Texas-Instruments-datasheet-8444271.pdf?src-supplier=Jameco, ComponentLink24Description=https://datasheet.octopart.com:443/TPS61041DBVR-Texas-Instruments-datasheet-112971.pdf?src-supplier=Sierra+IC, ComponentLink24URL=https://datasheet.octopart.com:443/TPS61041DBVR-Texas-Instruments-datasheet-112971.pdf?src-supplier=Sierra+IC, ComponentLink25Description=https://datasheet.octopart.com:443/TPS61041DBVR-Texas-Instruments-datasheet-46314.pdf?src-supplier=DigiKey, ComponentLink25URL=https://datasheet.octopart.com:443/TPS61041DBVR-Texas-Instruments-datasheet-46314.pdf?src-supplier=DigiKey, ComponentLink26Description=http://sigma.octopart.com:80/reach_statement/Texas-Instruments-company-64.pdf?src-supplier=Compliance+Statements, ComponentLink26URL=http://sigma.octopart.com:80/reach_statement/Texas-Instruments-company-64.pdf?src-supplier=Compliance+Statements, ComponentLink27Description=http://sigma.octopart.com:80/conflict_mineral_statement/Texas-Instruments-company-63.pdf?src-supplier=Compliance+Statements, ComponentLink27URL=http://sigma.octopart.com:80/conflict_mineral_statement/Texas-Instruments-company-63.pdf?src-supplier=Compliance+Statements, Efficiency=85%, Height=1.45mm, Lead Free="Lead Free", Length=2.9mm, Lifecycle Status=Production, Max Output Current=50mA, Max Supply Voltage=6V, Min Output Voltage=1.8V, Min Supply Voltage=1.8V, Nominal Input Voltage=6V, Number of Channels=1, Number of Outputs=1, Number of Pins=5, Output Type=Adjustable, Output Voltage=28V, Packaging="Cut Tape", Radiation Hardening=No, REACH SVHC=No, Schedule B="8542390000, 8542390000|8542390000|8542390000|8542390000|8542390000", Supplier 1=DigiKey, Switching Frequency=1MHz, Termination=SMD/SMT, Thickness=1.2mm, Topology=Boost, Weight=13.012431mg, Width=1.6mm